# Altium PCB PCB1_LEDs.PcbDoc
Units mm, origin at the board's own origin, x right, y up, seen from the top; angles counter-clockwise.
Board outline 66 x 24 mm, 2 copper layers (Top Layer, Bottom Layer), stack 1.671 mm thick; 28 components, 26 nets, 77 pads, 15 vias.
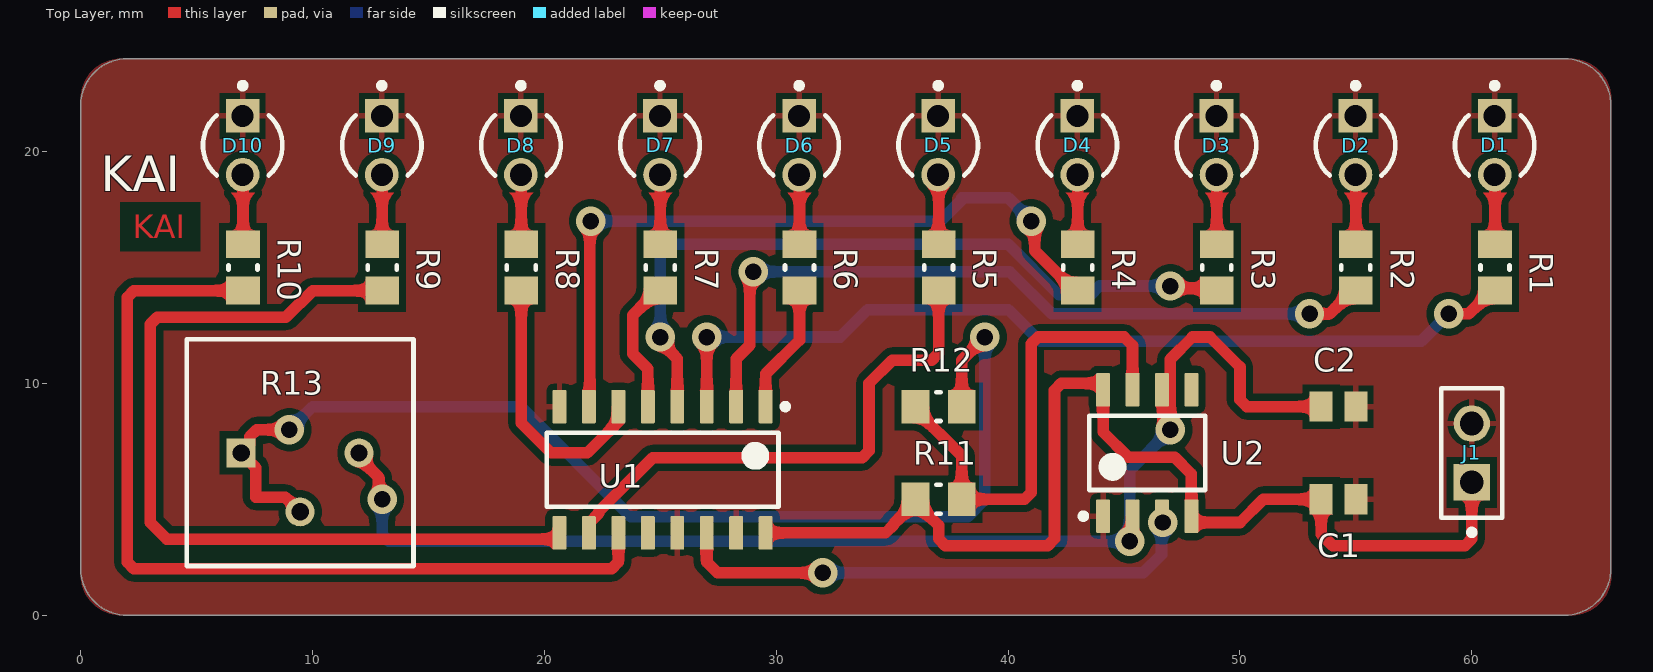
[diagram p0: Top Layer view]
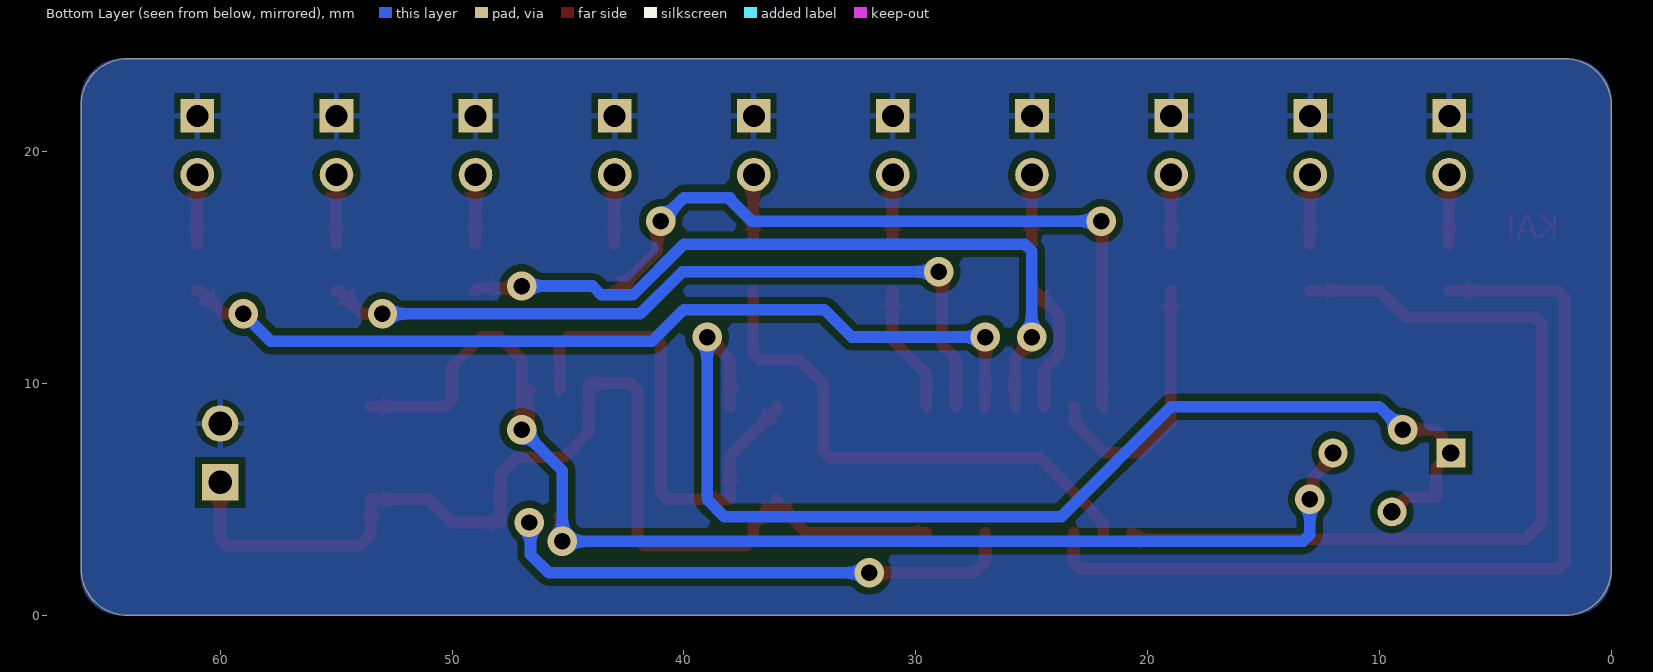
[diagram p1: Bottom Layer view, seen from below]
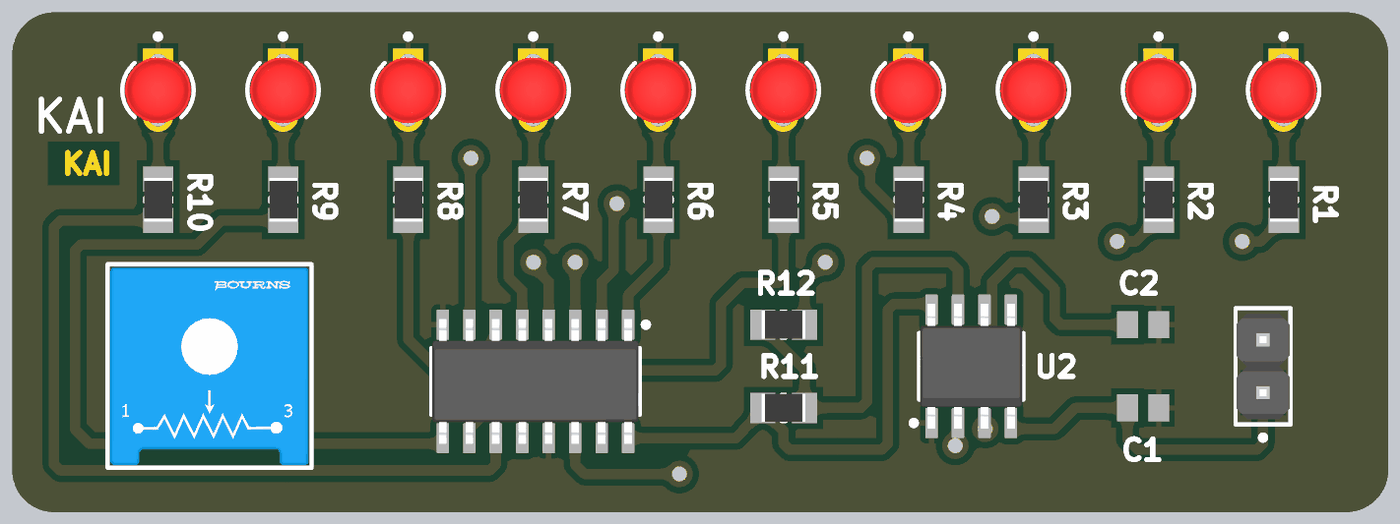
[diagram p2: 3D render of the assembled board from above, using the file's embedded part models]

## Layer stack, top to bottom
Top Solder: solder mask 0.0102, Solder Resist, Dk 3.5
Top Layer: signal copper 0.0356
Dielectric 1: dielectric 1.6, FR-4, Dk 4.8
Bottom Layer: signal copper 0.0356
Bottom Solder: solder mask 0.0102, Solder Resist, Dk 3.5

## Board outline
0,2 0,22 cw(c2,22) 2,24 64,24 cw(c64,22) 66,22 66,2 cw(c64,2) 64,0 2,0 cw(c2,2)

## Design rules (kind name [scope] priority, off if disabled: settings)
Clearance [All] p1: gap=0.3 ignorepadtopadclearanceinfootprint=FALSE
PolygonConnect [All] p1: connectstyle=Relief reliefconductorwidth=0.254 reliefentries=4 polygonreliefangle="90 Angle" airgapwidth=0.254
RoutingVias [All] p1: holewidth=0.3 width=0.6 viastyle="Through Hole" minholewidth=0.3 minwidth=0.6 maxholewidth=0.3 maxwidth=0.6
SilkToSolderMaskClearance [IsPad] p1: minsilkscreentomaskgap=0.1 clearancetoexposedcopper=TRUE
SolderMaskExpansion [All] p1: expansion=0 istentingtop=FALSE
SupplyNets "Schematic Supply Nets_1" [InNet('GND')] p1: voltage=0.000
SupplyNets "Schematic Supply Nets" [InNet('VCC')] p2: voltage=0.000
UnRoutedNet [All] p1: checkbadconnections=TRUE
Width [All] p1: maxlimit=1 minlimit=0.3 preferedwidth=0.5
28 further rules are at their usual default settings.

## Components (designator, comment, footprint, x,y, rotation, side; value= is the part's Value field where it differs from the comment)
C1 "GRM21BR71H105KA12L" CAPC2013X135X45LL10T25 54.25,5 r180 top
C2 "GRM21BR71H105KA12L" CAPC2013X135X45LL10T25 54.25,9 r180 top
D1 "HLMP-1301" FP-HLMP-1301-MFG 60.985,20.269 r270 top
D2 "HLMP-1301" FP-HLMP-1301-MFG 54.985,20.269 r270 top
D3 "HLMP-1301" FP-HLMP-1301-MFG 48.985,20.269 r270 top
D4 "HLMP-1301" FP-HLMP-1301-MFG 42.985,20.269 r270 top
D5 "HLMP-1301" FP-HLMP-1301-MFG 36.985,20.269 r270 top
D6 "HLMP-1301" FP-HLMP-1301-MFG 30.985,20.269 r270 top
D7 "HLMP-1301" FP-HLMP-1301-MFG 24.985,20.269 r270 top
D8 "HLMP-1301" FP-HLMP-1301-MFG 18.985,20.269 r270 top
D9 "HLMP-1301" FP-HLMP-1301-MFG 12.985,20.269 r270 top
D10 "HLMP-1301" FP-HLMP-1301-MFG 6.985,20.269 r270 top
J1 "M20-9990246" FP-M20-9990246-MFG 60,7 r90 top
R1 "RC0805FR-071KL" RESC2013X60X35ML10T20 61,15 r90 top
R2 "RC0805FR-071KL" RESC2013X60X35ML10T20 55,15 r90 top
R3 "RC0805FR-071KL" RESC2013X60X35ML10T20 49,15 r90 top
R4 "RC0805FR-071KL" RESC2013X60X35ML10T20 43,15 r90 top
R5 "RC0805FR-071KL" RESC2013X60X35ML10T20 37,15 r90 top
R6 "RC0805FR-071KL" RESC2013X60X35ML10T20 31,15 r90 top
R7 "RC0805FR-071KL" RESC2013X60X35ML10T20 25,15 r90 top
R8 "RC0805FR-071KL" RESC2013X60X35ML10T20 19,15 r90 top
R9 "RC0805FR-071KL" RESC2013X60X35ML10T20 13,15 r90 top
R10 "RC0805FR-071KL" RESC2013X60X35ML10T20 7,15 r90 top
R11 "RC0805FR-071KL" RESC2013X60X35ML10T20 37,5 r180 top
R12 "RC0805FR-071KL" RESC2013X60X35ML10T20 37,9 r180 top
R13 "3386P-1-104LF" FP-3386P-MFG 9.46,7.015 r0 top
U1 "CD4017BM" D0016A_N 25.095,6.275 r270 top
U2 "NE555DR" D0008A_N 46,7 r90 top

## Footprints (in the part's own frame and the unit in brackets; to place one, negate y for a bottom-side part, rotate by r counter-clockwise, add the part's x,y. Pads: shape width x height; smd on the part's side, far side on the other; paste and mask are expansions set on the pad)
CAPC2013X135X45LL10T25 [mm] "Chip Capacitor, 2-Leads, Body 2.00x1.25mm, IPC High Density"
  rect 1x1.3 smd: 1(-0.75,0) 2(0.75,0)
  body extent -1.05,-0.67 1.05,0.68, height 1.35
D0008A_N [mm] "SOIC, 8-Leads, Body 5x4mm, Pitch 1.27mm, IPC Medium Density"
  rrect17% 1.45x0.6 smd: 1(-2.725,1.905) 2(-2.725,0.635) 3(-2.725,-0.635) 4(-2.725,-1.905) 5(2.725,-1.905) 6(2.725,-0.635) 7(2.725,0.635) 8(2.725,1.905)
  silkscreen extent -2.85,-2.5 1.6,2.88, body extent -3,-2.45 3,2.45, height 1.63
D0016A_N [mm] "SOIC, 16-Leads, Body 10x4mm, Pitch 1.27mm, IPC Medium Density"
  rrect17% 1.45x0.6 smd: 1(-2.725,4.445) 2(-2.725,3.175) 3(-2.725,1.905) 4(-2.725,0.635) 5(-2.725,-0.635) 6(-2.725,-1.905) 7(-2.725,-3.175) 8(-2.725,-4.445) 9(2.725,-4.445) 10(2.725,-3.175) 11(2.725,-1.905) 12(2.725,-0.635) 13(2.725,0.635) 14(2.725,1.905) 15(2.725,3.175) 16(2.725,4.445)
  silkscreen extent -2.85,-5 1.6,5.42, body extent -3,-4.95 3,4.95, height 1.59
FP-3386P-MFG [mm]
  rect 1.25x1.25 hole 0.75 paste-2539.97 mask+0: 1(-2.54,-0.015)
  round 1.25 hole 0.75 paste-2539.97 mask+0: 2(0,-2.555) 3(2.54,-0.015)
  silkscreen extent -4.89,-4.89 4.89,4.89, body extent -4.99,-4.99 4.99,4.99, height 0.25
FP-HLMP-1301-MFG [mm]
  rect 1.45x1.45 hole 0.95 paste-2539.97 mask+0: 1(-1.27,0)
  round 1.45 hole 0.95 paste-2539.97 mask+0: 2(1.27,0)
  silkscreen extent -2.7,-1.71 1.3,1.71, body extent -2.22,-2.22 2.22,2.22, height 0.25
FP-M20-9990246-MFG [mm]
  rect 1.57x1.57 hole 1.02 paste-2539.97 mask+0: 1(-1.27,0)
  round 1.57 hole 1.02 paste-2539.97 mask+0: 2(1.27,0)
  silkscreen extent -3.55,-1.32 2.79,1.32, body extent -2.89,-1.42 2.89,1.42, height 0.25
RESC2013X60X35ML10T20 [mm] "Chip Resistor, 2-Leads, Body 2.1x1.35mm, IPC Low Density"
  rect 1.2x1.45 smd: 1(-1,0) 2(1,0)
  silkscreen extent -0.1,-0.63 0.1,0.63, body extent -1.05,-0.68 1.05,0.67, height 0.6

## Part data
C1 C2: library part CMP-1036-04761-2, Manufacturer=Murata, Part Number=GRM21BR71H105KA12L
D1 D2 D3 D4 D5 D6 D7 D8 D9 D10: library part CMP-18399-000007-1, "LED RED DIFFUSED T-1 T/H", Colour=Red, Forward Current=10mA, Forward Voltage=1.9V, Manufacturer=Broadcom, Max Junction Temp=+110°C, Package=0, Reverse Voltage=5V, Temperature="-40°C to +100°C", Temperature Range High=+100°C, Temperature Range Low=-40°C, Automotive=No, Category=Diode, ComponentLink2Description=Datasheet, ComponentLink2URL=https://docs.broadcom.com/docs/AV02-1555EN, Device Class L1=Optoelectronics, Device Class L2=LEDs, Device Class L3=unset, Digikey Description="LED RED DIFFUSED T-1 T/H", Lead Free=Yes, Led Orientation=Straight, Luminous Intensity=3.4mcd, Manufacturer Part Number=HLMP-1301, Mouser Description="Standard LEDs - Through Hole Red Diffused 635nm 3.4mcd", Octopart=https://octopart.com/hlmp-1301-broadcom-71130345, Peak Emmision Wavelength=635nm, RoHS=TRUE, Viewing Angle=60°, Wavelength=626nm
J1: library part CMP-15831-000009-1, "CONN HEADER VERT 2POS 2.54MM", Current Rating=3A, Manufacturer=Harwin, Temperature="-40°C to +105°C", Temperature Range High=+105°C, Temperature Range Low=-40°C, Automotive=No, Category=Conn, ComponentLink2Description=Datasheet, ComponentLink2URL=https://cdn.harwin.com/pdfs/M20-999.pdf, Conn Gender=Male, Conn Orientation=Vertical, Contact Material=Tin,Nickel, Device Class L1=Connectors, Device Class L2="Headers and Wire Housings", Device Class L3=unset, Digikey Description="CONN HEADER VERT 2POS 2.54MM", Height=8.99mm, Lead Free=Yes, Manufacturer Part Number=M20-9990246, Mouser Description="2.54mm (0.1\") Pitch SIL Vertical PC Tail Pin Header, 6.1mm mating pin height, tin, 2 contacts", Number Of Contacts=2, Number Of Rows=1, Octopart=https://octopart.com/m20-9990246-harwin-2590635, Package=M20-9990246, Pitch=2.54mm, RoHS=TRUE
R1 R2 R3 R4 R5 R6 R7 R8 R9 R10: library part CMP-2100-03671-1, "Chip Resistor, 1 KOhm, +/- 1%, 125 mW, -55 to 155 degC, 0805 (2012 Metric), RoHS, Tape and Reel", Case Code (Imperial)=0805, Case Code (Metric)=2012, Manufacturer=Yageo, Max Operating Temperature=155degC, Max Power Dissipation=125mW, Min Operating Temperature=-55degC, Package Description="2-Pin Surface Mounted Device, Body 2 x 1.25 mm", Package Quantity=1, Resistance=1KOhm, Temperature Coefficient=100ppm/degreesC, Tolerance=1%, Voltage Rating=150V, Case/Package=0805, Composition=ThickFilm, Datasheet URL=http://www.yageo.com/NewPortal/yageodocoutput?fileName=/pdf/R-Chip/PYu-RC_Group_51_RoHS_L_5.pdf, Datasheet Version="Rev. 5, 10/2016", Depth=1.25mm, Height=0.024inch, Lead Free=LeadFree, Length=0.079inch, Manufacturer URL=http://www.yageo.com/, Military Standard=Not, Number of Pins=2, Number of Terminations=2, Package Reference=0805, Packaging=TapeandReel, Power Rating=125mW, REACH SVHC=Unknown, RoHSCompliant=true, Termination=SMD/SMT, Voltage Rating (DC)=150V, Width=0.049inch
R11: library part CMP-2100-03671-1, "Chip Resistor, 2.2 KOhm, +/- 1%, 125 mW, -55 to 155 degC, 0805 (2012 Metric), RoHS, Tape and Reel", Case Code (Imperial)=0805, Case Code (Metric)=2012, Manufacturer=Yageo, Max Operating Temperature=155degC, Max Power Dissipation=125mW, Min Operating Temperature=-55degC, Package Description="2-Pin Surface Mounted Device, Body 2 x 1.25 mm", Package Quantity=1, Resistance=1KOhm, Temperature Coefficient=100ppm/degreesC, Tolerance=1%, Voltage Rating=150V, Case/Package=0805, Composition=ThickFilm, Datasheet URL=http://www.yageo.com/NewPortal/yageodocoutput?fileName=/pdf/R-Chip/PYu-RC_Group_51_RoHS_L_5.pdf, Datasheet Version="Rev. 5, 10/2016", Depth=1.25mm, Height=0.024inch, Lead Free=LeadFree, Length=0.079inch, Manufacturer URL=http://www.yageo.com/, Military Standard=Not, Number of Pins=2, Number of Terminations=2, Package Reference=0805, Packaging=TapeandReel, Power Rating=125mW, REACH SVHC=Unknown, RoHSCompliant=true, Termination=SMD/SMT, Voltage Rating (DC)=150V, Width=0.049inch
R12: library part CMP-2100-03671-1, "Chip Resistor, 10 KOhm, +/- 1%, 125 mW, -55 to 155 degC, 0805 (2012 Metric), RoHS, Tape and Reel", Case Code (Imperial)=0805, Case Code (Metric)=2012, Manufacturer=Yageo, Max Operating Temperature=155degC, Max Power Dissipation=125mW, Min Operating Temperature=-55degC, Package Description="2-Pin Surface Mounted Device, Body 2 x 1.25 mm", Package Quantity=1, Resistance=1KOhm, Temperature Coefficient=100ppm/degreesC, Tolerance=1%, Voltage Rating=150V, Case/Package=0805, Composition=ThickFilm, Datasheet URL=http://www.yageo.com/NewPortal/yageodocoutput?fileName=/pdf/R-Chip/PYu-RC_Group_51_RoHS_L_5.pdf, Datasheet Version="Rev. 5, 10/2016", Depth=1.25mm, Height=0.024inch, Lead Free=LeadFree, Length=0.079inch, Manufacturer URL=http://www.yageo.com/, Military Standard=Not, Number of Pins=2, Number of Terminations=2, Package Reference=0805, Packaging=TapeandReel, Power Rating=125mW, REACH SVHC=Unknown, RoHSCompliant=true, Termination=SMD/SMT, Voltage Rating (DC)=150V, Width=0.049inch
R13: library part CMP-2000-05592-8, "TRIMMER 100K OHM 0.5W PC PIN TOP", Color=Blue, Manufacturer Series=3386, Max Operating Temperature=125°C, Max Power Dissipation=500mW, Min Operating Temperature=-55°C, Package Quantity=100, Resistance=100kR, Resistance Law=Linear, Resistance Tolerance=10%, Resistor Type=Cermet, Temperature Coefficient=100ppm/°C, Voltage Rating=300V, Actuator Orientation=Vertical, Actuator Type=SCREW, Contact Plating=Tin, Depth=9.53mm, Height=4.83mm, Lead Free="Contains Lead", Length=9.53mm, Military Standard=Not, Mount="Through Hole", Number of Pins=3, Number of Terminals/Pins=3, Number of Turns=1, Packaging=Rail/Tube, Power Rating=500mW, Radiation Hardening=No, Reach SVHC Compliant=Yes, RoHS Compliant=Yes, Series="Trimpot® 3386 - Sealed", Taper=Linear, Technology=CERMET, Terminal Finish=Tin, Termination=Pin, Tolerance=10%, Type=Potentiometer, Weight=0.03oz, Width=9.53mm
U1: library part CMP-1623-00071-2, "CMOS Decade Counter with 10 Decoded Outputs, D0016A, TUBE", F @ Nom Voltage(Max)(Mhz)=8, Generic Part Number=CD4017B, ICC @ Nom Voltage(Max)(mA)=0.03, Manufacturer="Texas Instruments", Operating Temperature Range(C)="-55 to 125", Rating=Military, tpd @ Nom Voltage(Max)(ns)=270, Voltage(Nom)(V)=10, Bits(#)=10, Code_JEDEC="MS-012 variation AC", DatasheetVersion=SCHS027C, Function=Counter, Input Type=CMOS, Inputs=1, Output Drive (IOL/IOH)(Max)(mA)=1.5/-1.5, Output Type=CMOS, PackageReference=D0016A, Schmitt Trigger=No, Technology Family=CD4000, Type=Decade, VCC(Max)(V)=18, VCC(Min)(V)=3
U2: library part CMP-016-00007-3, "Precision Timer, 4.5 to 16 V, 0 to 70 degC, 8-Pin SOIC (D), Green (RoHS & no Sb/Br), Tape and Reel", Case/Package=SOIC, Frequency=100kHz, Manufacturer="Texas Instruments", Max Operating Temperature=70°C, Max Ouput Current=-200mA, Max Supply Voltage=16V, Min Operating Temperature=0°C, Min Supply Voltage=4.5V, Package Description="8-Pin Small Outline Integrated Circuit, Body 4.9 x 3.9 mm, Pitch 1.27 mm", Package Quantity=2500, Package Reference=D0008A, Package Version="4040047-3/M, 06/2011", Datasheet URL=http://www.ti.com/general/docs/lit/getliterature.tsp?genericPartNumber=NE555&fileType=pdf, Datasheet Version="SLFS022I, 09/2014", Manufacturer URL=http://www.ti.com/, Mounting Technology=SM, Package URL=http://www.ti.com/lit/ml/msoi002j/msoi002j.pdf, Packaging=TapeandReel, Pins=8, RoHS Compliant=True

## Via types
v1: diameter 1.27/1.27 (per signal layer), hole 0.711, Top Layer to Bottom Layer, tented both sides, 15 vias

## Nets (pads, with @x,y where several pads share a name; then routed paths per layer and width w, separated by ;. In a path a pad name is that pad's centre, name@x,y a point inside that pad or via, vN(x,y) a via of type N, cw(c..) or ccw(c..) an arc to the next point about the centre after c; other vN are vias at no path point)
GND: C1.1 C2.1 D1.1 D2.1 D3.1 D4.1 D5.1 D6.1 D7.1 D8.1 D9.1 D10.1 J1.2 U1.8 U1.13 U1.15 U2.1
NetC2_2: C2.2 R13.3 U2.2 U2.6 | length 56.9
  Top Layer w0.5: R13.3 12,6.797 12.853,5.944 12.853,5.147 v1(13,5) ; v1(45.238,3.185) 45.315,3.262 45.315,4.225 U2.2 ; U2.6 46.685,9.675 46.685,8.523 47,8.208 v1(47,8) 47,11.047 47.953,12 48.707,12 50,10.707 50,9.293 50.293,9 C2.2
  Bottom Layer w0.5: v1(13,5) 13,3.478 13.293,3.185 v1(45.238,3.185) 45.238,6.238 v1(47,8)
NetD1_2: D1.2 R1.2 | length 2.7
  Top Layer w0.5: R1.2 D1.2@61,18.73
NetD2_2: D2.2 R2.2 | length 2.7
  Top Layer w0.5: R2.2 D2.2@55,18.73
NetD3_2: D3.2 R3.2 | length 2.7
  Top Layer w0.5: R3.2 D3.2@49,18.73
NetD4_2: D4.2 R4.2 | length 2.7
  Top Layer w0.5: R4.2 D4.2@43,18.73
NetD5_2: D5.2 R5.2 | length 2.7
  Top Layer w0.5: R5.2 D5.2@37,18.73
NetD6_2: D6.2 R6.2 | length 2.7
  Top Layer w0.5: R6.2 D6.2@31,18.73
NetD7_2: D7.2 R7.2 | length 2.7
  Top Layer w0.5: R7.2 D7.2@25,18.73
NetD8_2: D8.2 R8.2 | length 2.7
  Top Layer w0.5: R8.2 D8.2@19,18.73
NetD9_2: D9.2 R9.2 | length 2.7
  Top Layer w0.5: R9.2 D9.2@13,18.73
NetD10_2: D10.2 R10.2 | length 2.7
  Top Layer w0.5: R10.2 D10.2@7,18.73
NetR1_1: R1.1 U1.3 | length 39
  Top Layer w0.5: U1.3 v1(27,12) ; v1(59,13) 59.875,13 60.875,14 R1.1
  Bottom Layer w0.5: v1(27,12) 32.757,12 33.942,13.185 40.008,13.185 41.378,11.815 57.815,11.815 v1(59,13)
NetR2_1: R2.1 U1.2 | length 33.3
  Top Layer w0.5: U1.2 28.27,11.062 28.853,11.644 28.853,14.668 v1(29,14.815) ; v1(53,13) 53.875,13 54.875,14 R2.1
  Bottom Layer w0.5: v1(29,14.815) 40.062,14.815 41.877,13 v1(53,13)
NetR3_1: R3.1 U1.4 | length 32.3
  Top Layer w0.5: v1(25,12) 25,11.792 25.73,11.062 U1.4 ; v1(47,14.2) 47.1,14.1 48.9,14.1 R3.1
  Bottom Layer w0.5: v1(25,12) 25,15.707 25.293,16 40.008,16 42.193,13.815 43.558,13.815 43.943,14.2 v1(47,14.2)
NetR4_1: R4.1 U1.7 | length 31.8
  Top Layer w0.5: U1.7 21.96,9.04 21.96,16.96 v1(22,17) ; v1(41,17) 41.147,16.853 41.147,15.728 42.875,14 R4.1
  Bottom Layer w0.5: v1(22,17) 37.073,17 38,17.927 38,18 40,18 v1(41,17)
NetR5_1: R5.1 U1.10 | length 23
  Top Layer w0.5: U1.10 21.92,3.975 22.339,4.394 22.339,4.471 24.667,6.8 33.707,6.8 34,7.093 34,10 35,11 36.707,11 37,11.293 R5.1
NetR6_1: R6.1 U1.1 | length 5.6
  Top Layer w0.5: U1.1 29.54,10.409 31,11.869 R6.1
NetR7_1: R7.1 U1.5 | length 5.8
  Top Layer w0.5: U1.5 24.46,10.635 23.815,11.28 23.815,12.94 24.875,14 R7.1
NetR8_1: R8.1 U1.6 | length 11.6
  Top Layer w0.5: R8.1 19,8.293 20.293,7 21.847,7 23.14,8.293 23.14,8.95 U1.6
NetR9_1: R9.1 U1.9 | length 37.3
  Top Layer w0.5: R9.1 10,14 8.85,12.85 3.293,12.85 3,12.557 3,4 3.715,3.285 20.6,3.285 20.65,3.335 U1.9
NetR10_1: R10.1 U1.11 | length 39.2
  Top Layer w0.5: R10.1 2.293,14 2,13.707 2,2.293 2.293,2 22.897,2 23.19,2.293 U1.11
NetR11_1: R11.1 R12.2 U2.7 | length 20.9
  Top Layer w0.5: R12.2 36,8.875 38,6.875 R11.1 40.707,5 41,5.293 41,11.707 41.293,12 45,12 45.365,11.635 U2.7
NetR12_1: R12.1 R13.1 R13.2 | length 50.1
  Top Layer w0.5: v1(9,8) 7.588,8 7.295,7.707 7.295,7.375 R13.1 7.555,6.365 7.555,5.095 8.825,5.095 R13.2 ; R12.1 38,11 v1(39,12)
  Bottom Layer w0.5: v1(9,8) 10,9 18.974,9 23.722,4.252 38.252,4.252 39,5 v1(39,12)
NetU1_14: U1.14 U2.3 | length 23.1
  Top Layer w0.5: U1.14 27,2.293 27.463,1.83 v1(32,1.83) ; U2.3 46.67,4.24 v1(46.67,4)
  Bottom Layer w0.5: v1(32,1.83) 45.83,1.83 46.615,2.615 46.615,3.945 v1(46.67,4)
VCC: C1.2 J1.1 R11.2 U1.16 U2.4 U2.8 | length 48.3
  Top Layer w0.5: U1.16 34.711,3.55 35.064,3.904 35.064,3.939 R11.2@36,4.875 ; R11.2 R11.2@36,4.875 ; U2.4@47.905,4.05 47.955,4 50,4 51,5 C1.2 53.5,3.5 54,3 59.707,3 60,3.293 J1.1 ; U2.4 47.905,6.095 47.185,6.815 45.185,6.815 44.095,7.905 U2.8 44.095,9.95 44.045,10 42.293,10 42,9.707 42,3.293 41.707,3 37.293,3 37,3.293 37,3.875 R11.2@36,4.875
pads on no net: U1.12 U2.5

## Polygon pours and split planes (outlines as drawn)
GND on Top Layer "GND_L01_P001" (solid, pour order 1): 1.778,0 cw(c1.778,1.778) 0,1.778 0,22.25 cw(c1.753,22.25) 1.753,24.003 64.237,24.003 cw(c64.237,22.225) 66.015,22.225 66.015,1.727 cw(c64.287,1.727) 64.287,0 1.778,0
GND on Bottom Layer "GND_L02_P000" (solid, pour order 0): 0,1.778 ccw(c1.778,1.778) 1.778,0 64.237,0 ccw(c64.237,1.778) 66.015,1.778 66.015,22.2 ccw(c64.211,22.2) 64.211,24.003 1.803,24.003 ccw(c1.803,22.2) 0,22.2 0,22.098

## Other copper
Top Layer:
  text "KAI" at 2.254,16.254 h1

## Silkscreen, mask and mechanical layers (free items; w line width, h text height)
Top Overlay:
  text "KAI" at 0.864,18.288 h1.52
Top Solder:
  text "KAI" at 2.254,16.254 h1
Mechanical 1:
  the board outline again, w0.254